# Altium PCB S67_07_2460.PcbDoc
Units mil, origin at the board's own origin, x right, y up, seen from the top; angles counter-clockwise.
Board outline 6000 x 4000 mil, 3 copper layers (Top Layer, Mid-Layer 1, Bottom Layer); 23 components, 15 nets, 71 pads, 1 vias.
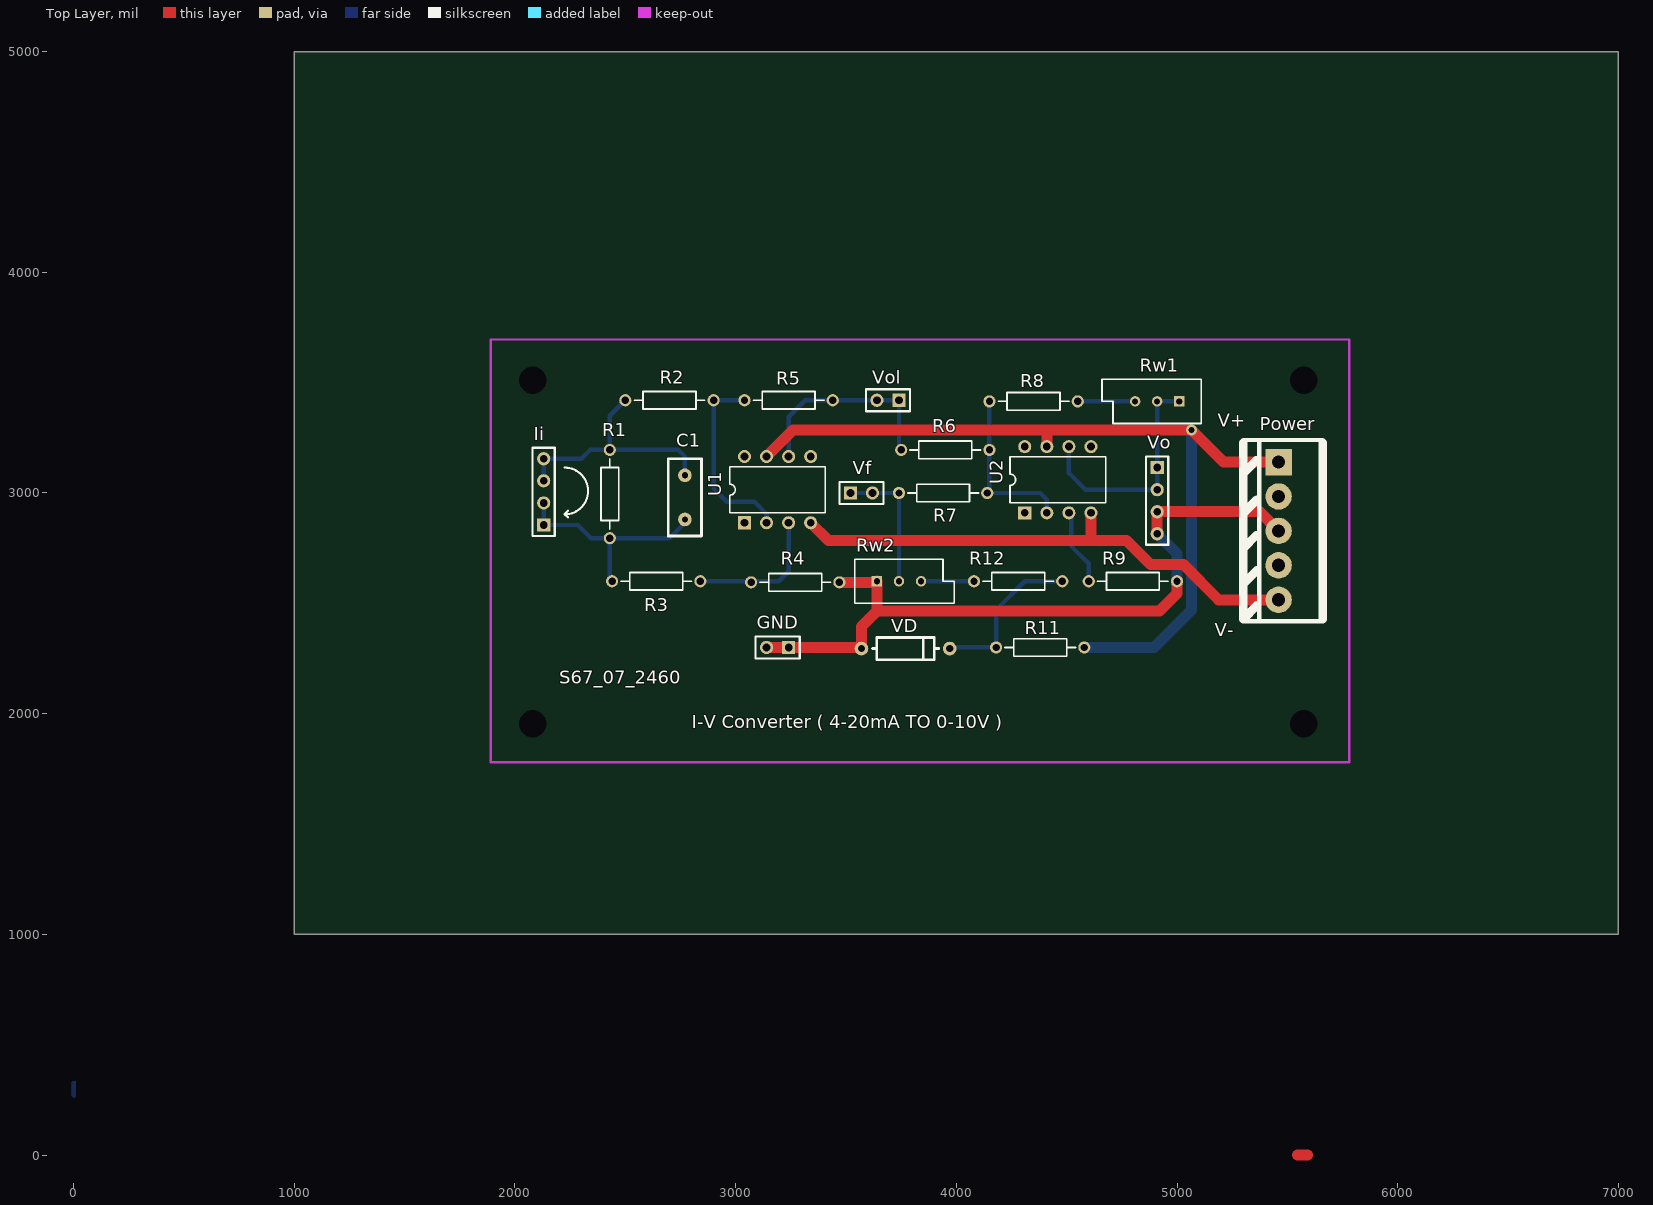
[diagram p0: Top Layer view]
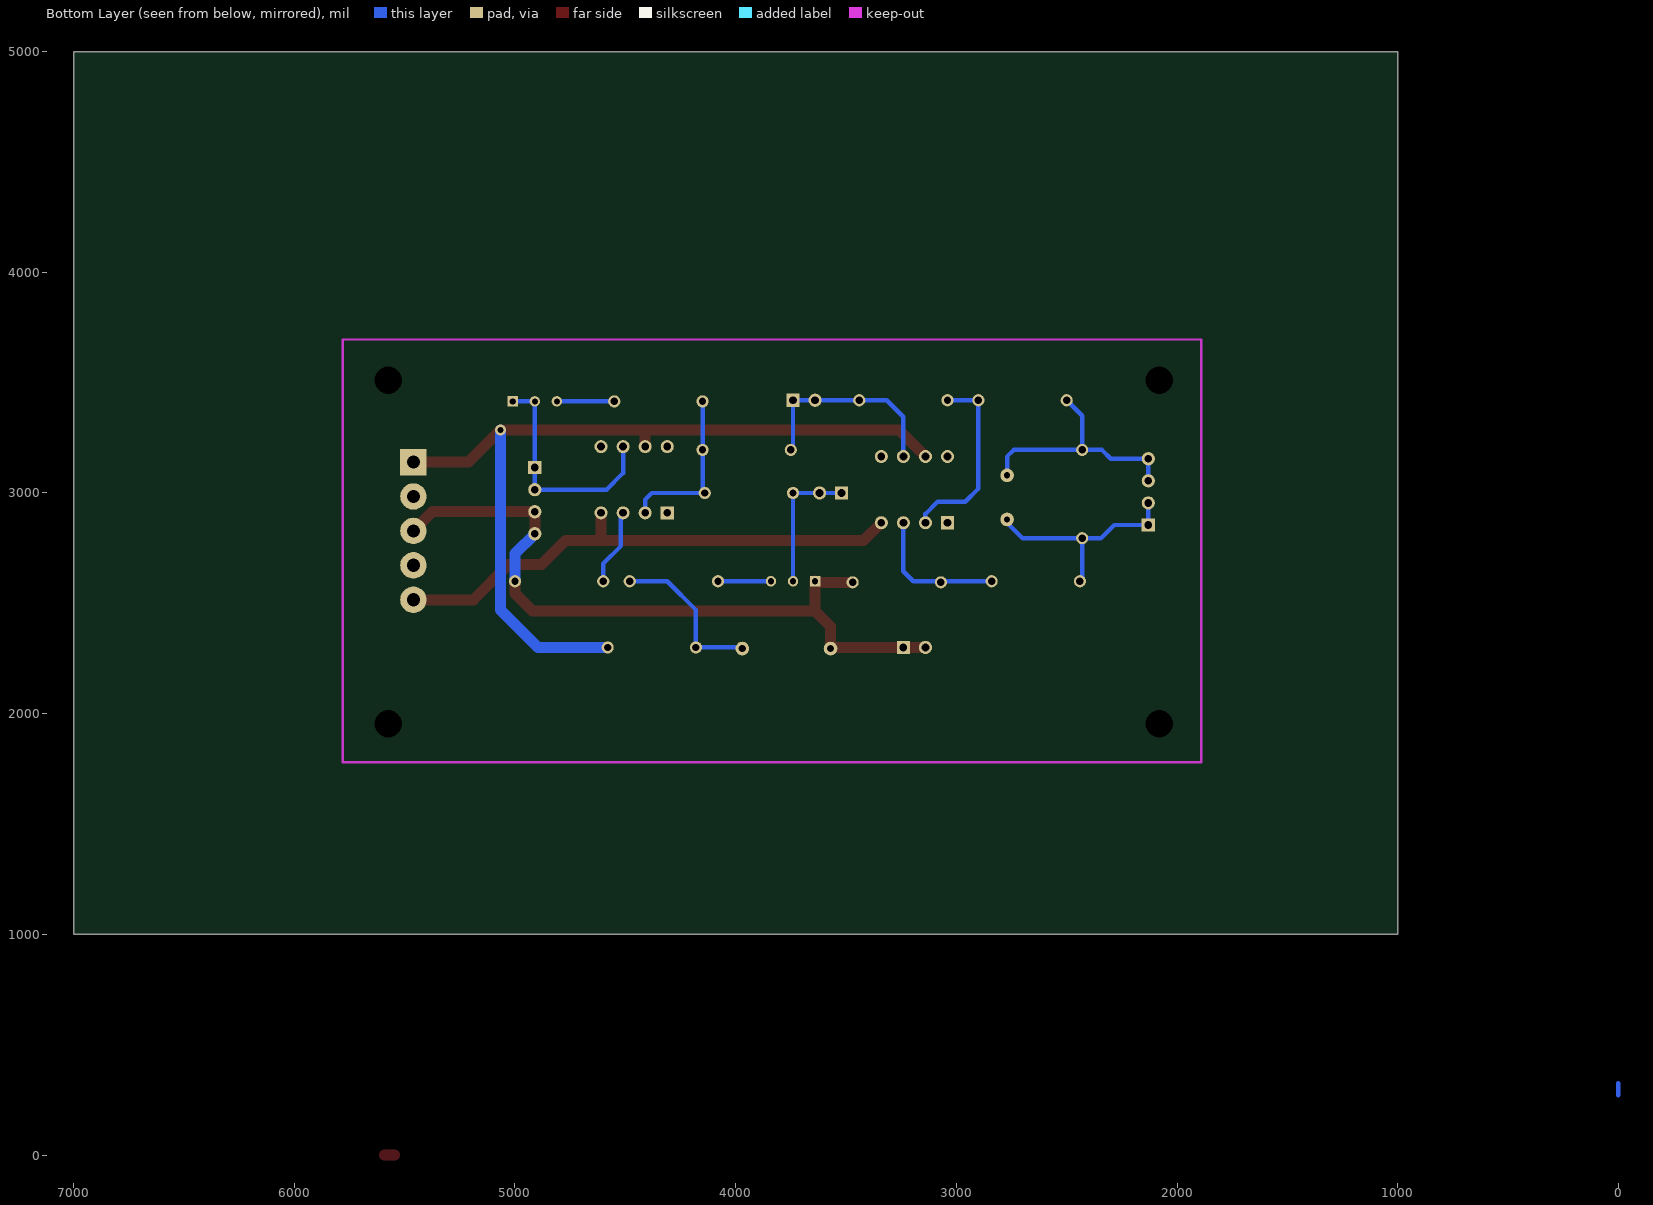
[diagram p1: Bottom Layer view, seen from below]

## Layer stack, top to bottom
Top Layer: signal copper 1.4
Dielectric: dielectric 12.6, FR-4, Dk 4.8
Mid-Layer 1: signal copper 1.4
Dielectric: dielectric 12.6, FR-4, Dk 4.8
Bottom Layer: signal copper 1.4

## Board outline
1000,1000 7000,1000 7000,5000 1000,5000

## Design rules (kind name [scope] priority, off if disabled: settings)
Clearance [All] p1: gap=10
PolygonConnect [All] p1: connectstyle=Relief reliefconductorwidth=10 reliefentries=4 polygonreliefangle="90 Angle"
RoutingVias [All] p1: holewidth=28 width=50 viastyle="Through Hole" minholewidth=28 minwidth=50 maxholewidth=28 maxwidth=50
SilkscreenOverComponentPads [All] p1 off: minsilkscreentomaskgap=10
SolderMaskExpansion [All] p1: expansion=4
TestPointUsage [All] p1: valid=0 allowmultiple=FALSE
Testpoint [All] p1: side=15 testpointundercomponent=TRUE minsize=40 maxsize=100 preferedsize=60 minholesize=0 maxholesize=40 preferedholesize=32 testpointgrid=1 style=1023 order=0-112345678
Width [All] p1: maxlimit=50 minlimit=10 preferedwidth=10
23 further rules are at their usual default settings.

## Components (designator, comment, footprint, x,y, rotation, side; value= is the part's Value field where it differs from the comment)
C1 "Cap" RAD0.2 2770,2880 r90 top
GND "Header 2" SIP-2 3240,2300 r180 top
Ii "Header 4" SIP-4 2130,2855 r90 top
Power "Header 5" "POWER PLUG5" 5460,3140 r90 top
R1 "Res2" AXIAL-0.4 2430,2995 r90 top
R2 "Res2" AXIAL-0.4 2700,3420 r180 top
R3 "Res2" AXIAL-0.4 2640,2600 r180 top
R4 "Res2" AXIAL-0.4 3270,2595 r0 top
R5 "Res2" AXIAL-0.4 3240,3420 r0 top
R6 "Res2" AXIAL-0.4 3950,3195 r0 top
R7 "Res2" AXIAL-0.4 3940,3000 r0 top
R8 "Res2" AXIAL-0.4 4350,3415 r0 top
R9 "Res2" AXIAL-0.4 4800,2600 r180 top
R11 "Res2" AXIAL-0.4 4380,2300 r0 top
R12 "Res2" AXIAL-0.4 4280,2600 r0 top
Rw1 "RPot" VR5 4910,3415 r180 top
Rw2 "RPot" VR5 3740,2600 r0 top
U1 "OP07CN" DIP8 3190,3015 r0 top
U2 "OP07CN" DIP8 4460,3060 r0 top
VD "5.1V" DIODE0.4 3570,2295 r0 top
Vf "Header 2" SIP-2 3520,3000 r0 top
Vo "Header 4" SIP-4 4910,3115 r270 top
Vol "Header 2" SIP-2 3740,3420 r180 top

## Footprints (in the part's own frame and the unit in brackets; to place one, negate y for a bottom-side part, rotate by r counter-clockwise, add the part's x,y. Pads: shape width x height; smd on the part's side, far side on the other; paste and mask are expansions set on the pad)
AXIAL-0.4 [mm] "Resistor; 2 Leads"
  round 1.4 hole 0.85: 1(-5.08,0) 2(5.08,0)
  silkscreen extent -4.06,-1.02 4.06,1.02
DIODE0.4 [mil]
  round 62 hole 32: 1(0,0) 2(400,0)
  silkscreen extent 50,-50 350,50
DIP8 [mm] "DIP; 8 Leads; Row Spacing 7.62 mm; Pitch 2.54 mm"
  rect 1.5x1.5 hole 0.9: 1(-3.81,-3.81)
  round 1.5 hole 0.9: 2(-1.27,-3.81) 3(1.27,-3.81) 4(3.81,-3.81) 5(3.81,3.81) 6(1.27,3.81) 7(-1.27,3.81) 8(-3.81,3.81)
  silkscreen extent -5.5,-2.65 5.5,2.65
"POWER PLUG5" [mil] "双电源插座"
  rect 120x120 hole 60: 1(0,0)
  round 120 hole 60: 2(-156,0) 3(-312,0) 4(-468,0) 5(-624,0)
  silkscreen extent -722,-200 100,160
RAD0.2 [mil]
  round 62 hole 28: 1(0,0) 2(200,0)
  silkscreen extent -75,-75 275,75
SIP-2 [mil]
  rect 60x60 hole 35: 1(0,0)
  round 60 hole 35: 2(100,0)
  silkscreen extent -50,-50 150,50
SIP-4 [mil]
  rect 60x60 hole 35: 1(0,0)
  round 60 hole 35: 2(100,0) 3(200,0) 4(300,0)
  silkscreen extent -50,-50 350,50
VR5 [mm] "Potentiometer; 3 Leads"
  rect 1.2x1.2 hole 0.7: 1(-2.54,0)
  round 1.2 hole 0.7: 2(0,0) 3(2.54,0)
  silkscreen extent -5.08,-2.54 6.35,2.54

## Part data
C1: "Capacitor"
GND Vf Vol: "Header, 2-Pin"
Ii Vo: "Header, 4-Pin"
Power: "Header, 5-Pin"
R1 R2 R3 R4 R5 R6 R7 R8 R9 R11 R12: "Resistor"
Rw1 Rw2: "Potentiometer"
U1 U2: "Very Low Offset Single Bipolar Operational Amplifier"
VD: library part "D Zener", "Zener Diode"

## Free pads (board coordinates)
  round 60 hole 125: 1(2080,3510) 2(2080,1955) 3(5575,3510) 4(5575,1955)

## Via types
v1: diameter 50, hole 28, Top Layer to Bottom Layer, 1 vias

## Nets (pads, with @x,y where several pads share a name; then routed paths per layer and width w, separated by ;. In a path a pad name is that pad's centre, name@x,y a point inside that pad or via, vN(x,y) a via of type N, cw(c..) or ccw(c..) an arc to the next point about the centre after c; other vN are vias at no path point)
+12V: Power.1 R11.2 U1.7 U2.7 | length 3879.3
  Top Layer w10: 4410,3275 4420,3285
  Top Layer w50: U1.7 3260,3285 4420,3285 v1(5065,3285) 5210,3140 Power.1 ; U2.7 4410,3275
  Bottom Layer w50: R11.2 4895,2300 5065,2470 v1(5065,3285)
-12V: Power.5 U1.4 U2.4 | length 2389.6
  Top Layer w50: U1.4 3420,2785 4610,2785 ; U2.4 4610,2785 ; Power.5 5189,2516 5030,2675 4880,2675 4770,2785 4610,2785
GND: GND.1 GND.2 Power.3 R4.2 R9.1 Rw2.1 VD.1 Vo.3 Vo.4 | length 3324.6
  Top Layer w50: GND.2 GND.1 3565,2300 VD.1 3570,2395 3640,2465 ; R4.2 3635,2595 Rw2.1 3640,2465 ; Vo.4 Vo.3 5373,2915 Power.3 ; R9.1 5000,2545 4920,2465 3640,2465
  Bottom Layer w50: Vo.4 5000,2725 R9.1
NetC1_1: C1.1 Ii.1 Ii.2 R1.1 R3.2 | length 1008
  Bottom Layer w20: Ii.2 Ii.1 2285,2855 2345,2795 R1.1 ; R3.2 2430,2610 R1.1 ; C1.1 2770,2865 2700,2795 R1.1
NetC1_2: C1.2 Ii.3 Ii.4 R1.2 R2.2 | length 1073
  Bottom Layer w20: Ii.3 Ii.4 2300,3155 2340,3195 R1.2 ; R2.2 2430,3350 R1.2 ; 2770,3115 2770,3165 2740,3195 R1.2
NetR2_1: R2.1 R5.1 U1.2 | length 867.6
  Bottom Layer w20: R5.1 R2.1 2900,3020 2960,2960 3085,2960 3140,2905 U1.2
NetR3_1: R3.1 R4.1 U1.3 | length 645.7
  Bottom Layer w20: R3.1 R4.1@3065,2600 ; R4.1 R4.1@3065,2600 ; U1.3 3240,2645 3195,2600 R4.1@3065,2600
NetR5_2: R5.2 R6.1 U1.6 Vol.1 Vol.2 | length 940.2
  Bottom Layer w20: U1.6 3240,3345 3315,3420 R5.2 Vol.2 Vol.1 3740,3205 R6.1
NetR6_2: R6.2 R7.2 R8.1 U2.2 | length 761.6
  Bottom Layer w20: R8.1 R6.2 4150,3010 R7.2 4380,3000 4410,2970 U2.2
NetR7_1: R7.1 Rw2.2 Vf.1 Vf.2 | length 620
  Bottom Layer w20: Vf.1 Vf.2 R7.1 Rw2.2
NetR8_2: R8.2 Rw1.3 | length 260
  Bottom Layer w20: R8.2 Rw1.3
NetR9_2: R9.2 U2.3 | length 338.1
  Bottom Layer w20: U2.3@4520,2905 4520,2760 4600,2680 R9.2
NetR11_1: R11.1 R12.2 VD.2 | length 735.9
  Bottom Layer w20: VD.2 3975,2300 R11.1 4180,2470 4310,2600 R12.2
NetR12_1: R12.1 Rw2.3 | length 240
  Bottom Layer w20: Rw2.3 R12.1
NetRw1_1: Rw1.1 Rw1.2 U2.6 Vo.1 Vo.2 | length 1051.1
  Bottom Layer w20: U2.6 4510,3090 4585,3015 Vo.2 Vo.1 Rw1.2 Rw1.1
pads on no net: Power.2 Power.4 U1.1 U1.5 U1.8 U2.1 U2.5 U2.8
copper on no net: | length 100
  Top Layer w50: 5545,0 5590,0
  Bottom Layer w20: 0,270 0,325

## Keep-outs
Keep-Out Layer:
  lines w10: 1890,1780 5780,1780 5780,3695 1890,3695 1890,1780

## Silkscreen, mask and mechanical layers (free items; w line width, h text height)
Top Overlay:
  lines w10: 2225,2902.87 ccw(c2225,3008.93) 2225,3115 ; 2225,2905 2240,2920 ; 2227.13,2902.87 2240,2890
  text "V+" at 5185,3300 h60
  text "V-" at 5170,2350 h60
  text "S67_07_2460" at 2200,2135 h60
  text "I-V Converter ( 4-20mA TO 0-10V )" at 2800,1935 h60